# Altium PCB Industrial_IOT_Dev_Brd-v1.0.PcbDoc (part 8 of 8)
Units mil, origin at the board's own origin, x right, y up, seen from the top; angles counter-clockwise.
Board outline 6299.21 x 4724.41 mil, 4 copper layers (Top Layer, Layer 1, Layer 2, Bottom Layer), stack 62.047 mil thick; 376 components, 240 nets, 1129 pads, 635 vias.
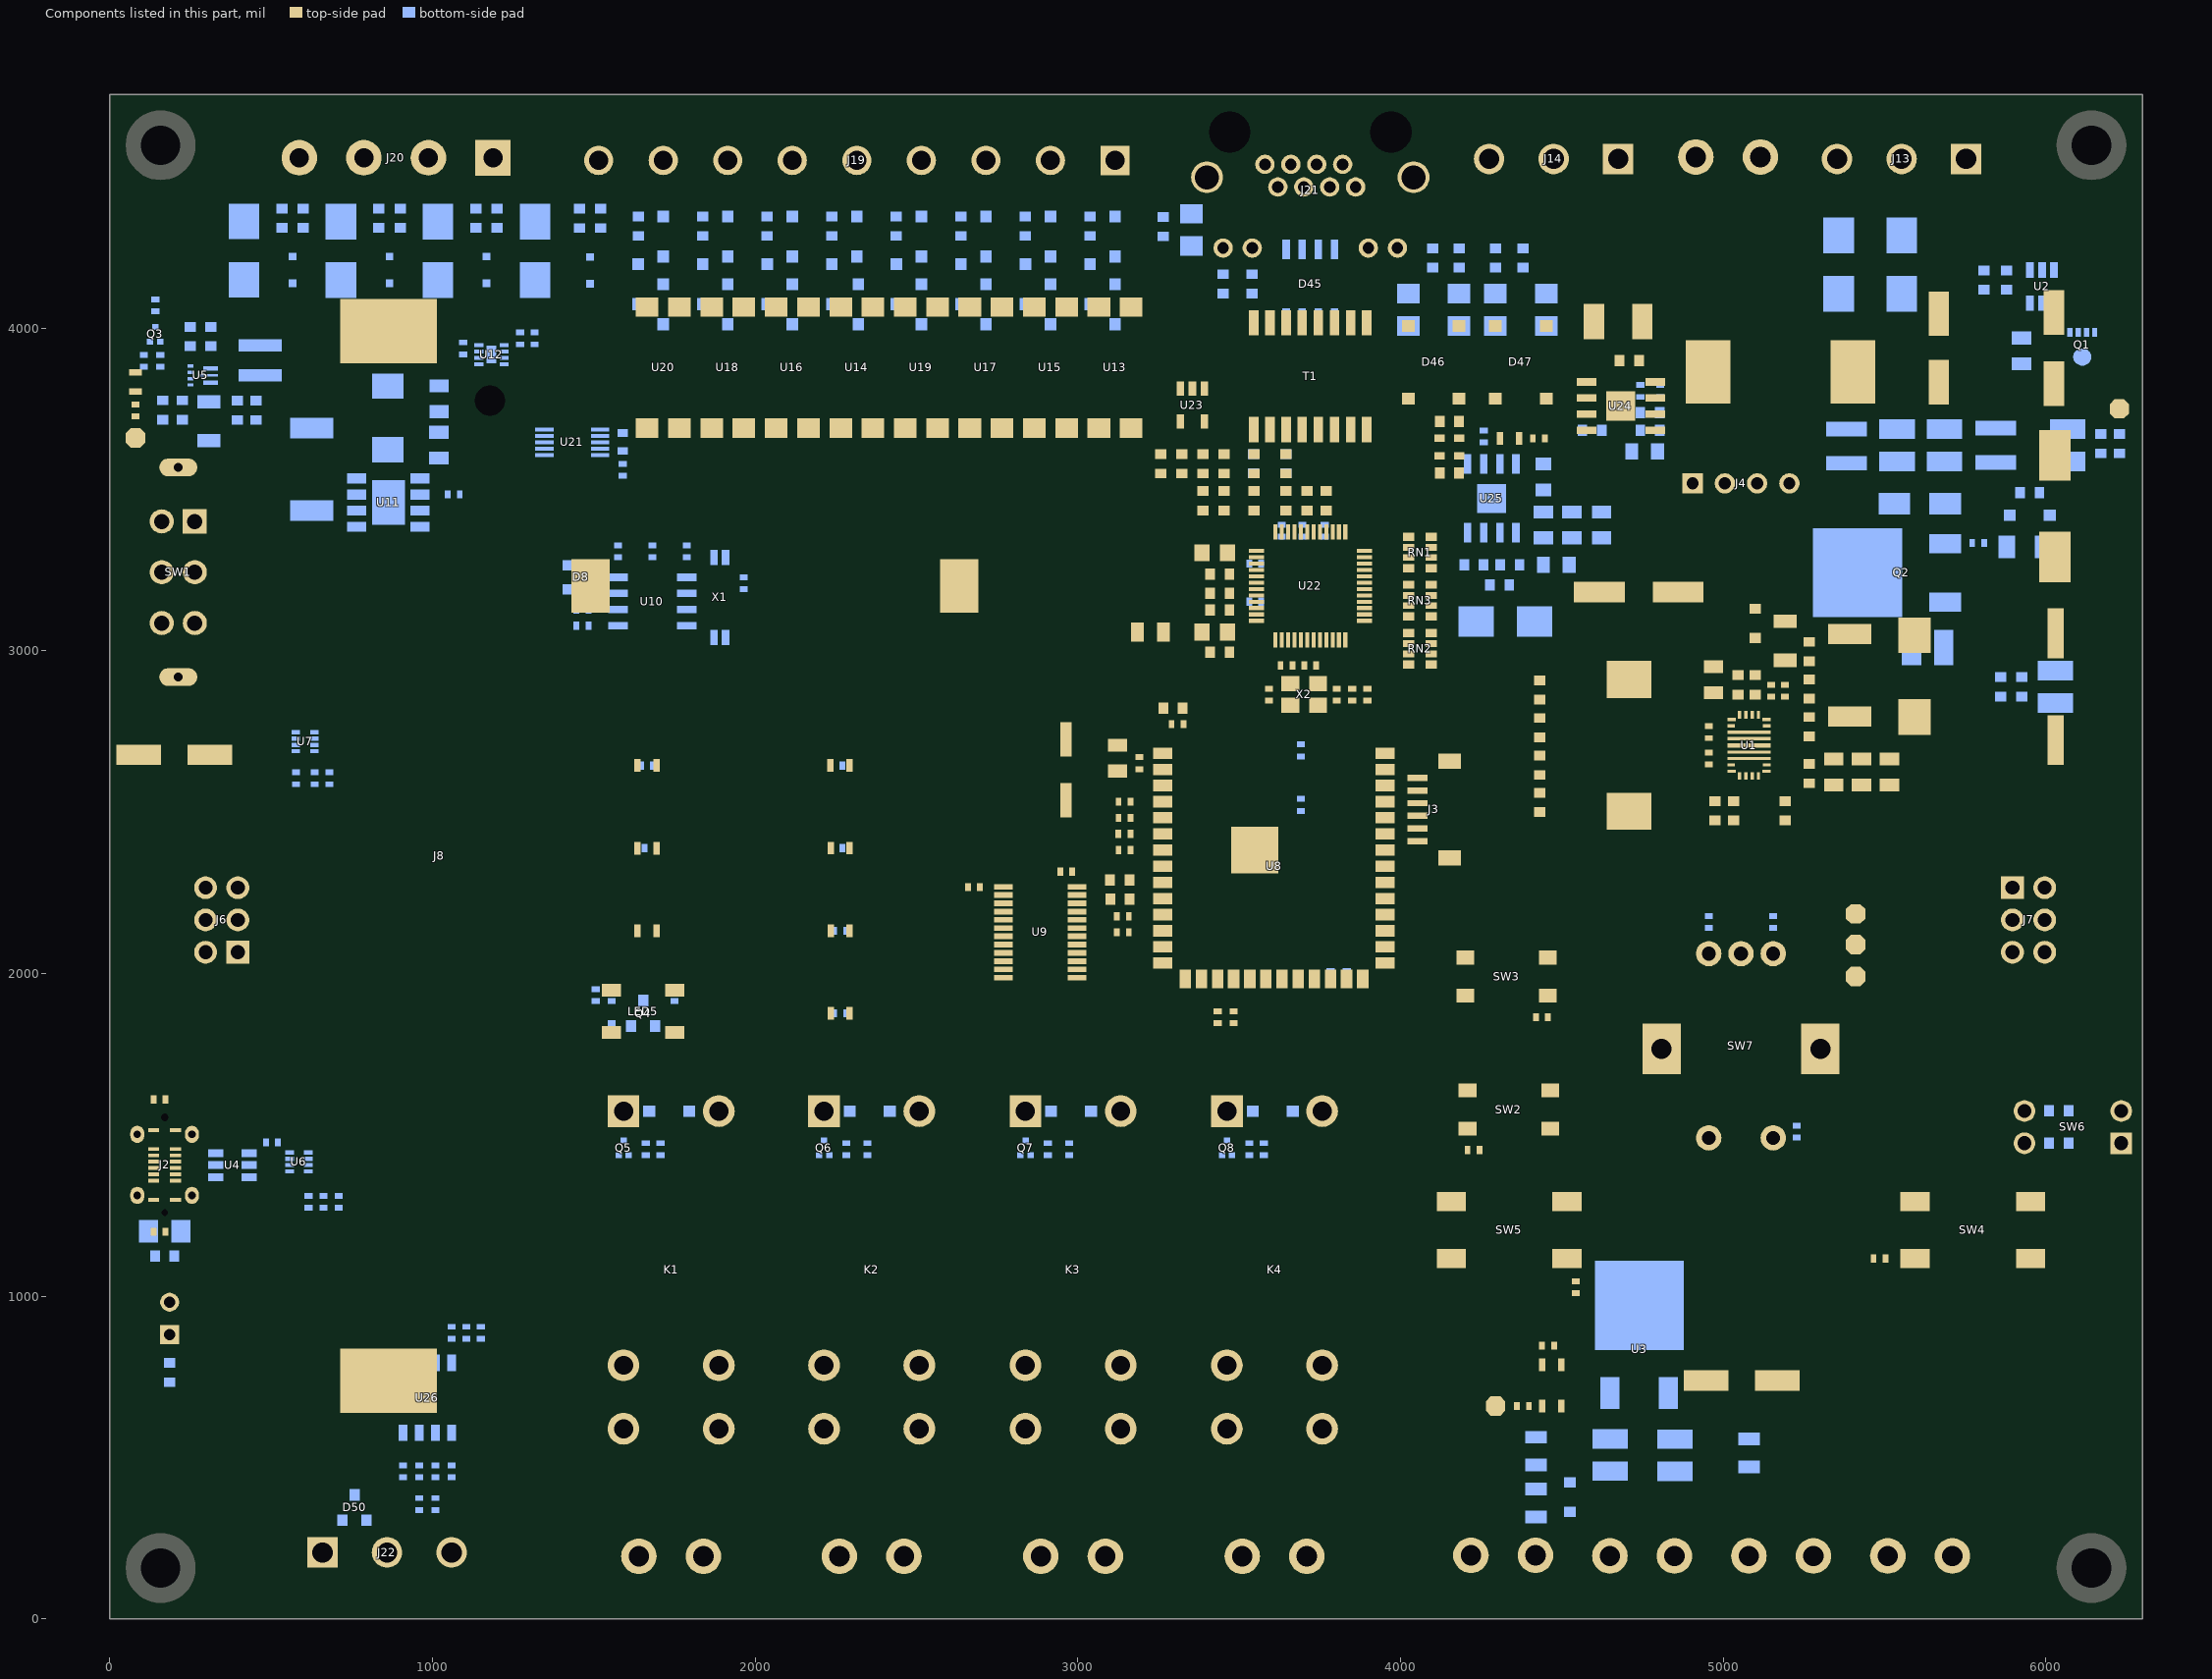
[diagram p7: the components of this part, seen from the top]

## Other copper
Top Layer:
  rectangle net VBUS-TYPEC: 119.1,1450.32 221.46,1466.77
  region net VBUS-TYPEC: 221.46,1363.71 119.1,1363.71 119.1,1332.76 221.46,1332.76
  rectangle net 3V3: 2968.2,2259.9 3056.17,2291.02
  rectangle net GND: 2748.98,2215.97 2790.27,2244.53
  region net #RD_N: 3460.63,3521.86 3444.48,3521.86 3444.48,3488.43 3460.63,3488.43
  rectangle net #RD_N: 3444.48,3522.25 3460.63,3555.67
  rectangle net #RD_P: 3379.23,3522.62 3395.38,3556.05
  region net #RD_P: 3395.38,3522.24 3379.23,3522.24 3379.23,3488.81 3395.38,3488.81
  region net RD_P: 3400.77,3744.09 3384.62,3744.09 3384.62,3705.52 3400.77,3705.52
  region net TD_N: 3325.4,3744.15 3309.25,3744.15 3309.25,3710.73 3325.4,3710.73
  rectangle net RD_N: 3384.6,3778.9 3400.75,3812.33
  rectangle net TD_P: 3309.61,3779.1 3325.76,3812.52
  rectangle net NetC1_2: 4942.54,2666.01 5005.13,2693.51
  rectangle net NetC15_2: 4916.86,2734.16 5005.13,2747.91
  rectangle net NetC1_2: 4916.86,2666.01 5005.13,2679.76
  rectangle net NetC15_2: 4942.54,2720.41 5005.13,2747.91
  rectangle net VIN: 5926,3527.27 6076.94,3733
  region net GND: 6075.98,0 6299.21,0 6299.21,223.23 ccw(c6141.37,157.85) 6141.37,328.7 ccw(c6141.36,157.85) 5970.51,157.85 ccw(c6141.36,157.85)
  region net GND: 6299.21,4501.18 6299.21,4724.41 6075.98,4724.41 ccw(c6141.36,4566.56) 5970.51,4566.56 ccw(c6141.36,4566.56) 6141.36,4395.71 ccw(c6141.36,4566.56)
  region net GND: 223.23,4724.41 0,4724.41 0,4501.18 ccw(c157.85,4566.56) 157.85,4395.71 ccw(c157.85,4566.56) 328.7,4566.56 ccw(c157.85,4566.56)
  region net GND: 0,223.23 0,0 223.23,0 ccw(c157.85,157.85) 328.7,157.85 ccw(c157.85,157.85) 157.85,328.7 ccw(c157.85,157.85)
  region net NetC67_2: 4545.92,3917.5 4545.92,3864.92 4536.25,3855.25 4535.92,3855.25 4535.92,3854.92 4535.92,3811.62 4544.09,3803.46 4598.73,3803.46 4606.94,3795.25 4606.94,3765.21 4598.73,3757 4501.44,3757 4491.73,3766.71 4491.73,3916.73 4500,3925 4538.42,3925
  region net 5V: 201 vertices and 20 holes, not listed, extent 241.34,610 5016.08,3037
  region net 3V3: 3292.82,2614.81 3163.12,2614.81 3135.08,2586.77 3135.08,2317.03 3135.06,2317.03 3135.06,2262.03 3135.08,2262.03 3135.08,2111.39 3127.52,2103.83 3082.21,2103.83 3075.39,2110.66 3075.39,2248.92 3064.41,2259.9 3037.26,2259.9 3037.26,2262.02 2968.2,2262.02 2968.2,2336.8 2955,2350 2908.05,2350 2890,2368.05 2890,2632.53 2907.72,2650.24 3292.82,2650.24
  region net 5V-PWR: 5135.25,3060.49 5135.25,3002.41 5145.95,2991.71 5227.49,2991.71 5227.49,2896.43 5217.02,2885.95 5179.16,2885.95 5172.18,2892.94 5172.18,2942.51 5165.19,2949.5 5039.51,2949.5 5029.09,2959.92 5029.09,3059.52 5039.86,3070.29 5125.45,3070.29
  region net NetC11_2: 5685,2840.08 5685,2647.04 5667.96,2630 5221.56,2630 5213.63,2637.93 5213.63,2704.42 5213.47,2704.58 5213.47,2711.3 5210.15,2719.31 5204.02,2725.45 5196,2728.77 5187.32,2728.77 5179.31,2725.45 5176.11,2722.25 5156.99,2722.25 5156.99,2742.98 5156.82,2742.98 5156.82,2743.14 5068.52,2743.14 5068.34,2743.57 5068.34,2752.82 5113.2,2752.82 5113.2,2752.67 5133.14,2752.67 5135.01,2752.3 5236.91,2752.3 5239.55,2752.82 5282.14,2752.82 5309.57,2780.25 5309.57,2835.96 5328.61,2855 5670.08,2855
  region net NetC1_2: 4878.22,2693.52 4883.27,2688.47 4891.29,2685.15 4899.96,2685.15 4907.98,2688.47 4911.18,2691.66 5002.96,2691.66 5002.96,2690.46 5005.13,2690.46 5005.13,2680.93 5002.96,2680.93 5002.96,2668.85 5000.14,2666.02 4989.99,2666.02 4978.02,2666.02 4977.54,2666.51 4932.54,2666.51 4932.54,2666.02 4838.49,2666.02 4819.99,2647.52 4819.99,2450.01 4799.99,2430.01 4413.91,2430.01 4400,2443.92 4400,2507.13 4413.17,2520.3 4600,2520.3 4609.99,2530.3 4609.99,2674.79 4628.72,2693.52
  region net NetC15_2: 4819.99,2963.91 4819.99,2766.4 4838.49,2747.9 4932.53,2747.9 4932.53,2747.4 4977.53,2747.4 4978.03,2747.9 4989.99,2747.9 5000.14,2747.9 5002.96,2745.07 5002.96,2732.98 5005.13,2732.98 5005.13,2723.45 5002.96,2723.45 5002.96,2722.25 4911.18,2722.25 4907.98,2725.45 4899.96,2728.77 4891.29,2728.77 4883.27,2725.45 4878.22,2720.4 4628.72,2720.4 4609.99,2739.13 4609.99,2883.63 4600,2893.62 4413.17,2893.62 4400,2906.79 4400,2970 4413.91,2983.91 4799.99,2983.91
  region net VBUS-TYPEC: 215.7,1494.48 219.44,1490.74 221.46,1485.85 221.46,1455.28 218.64,1452.45 177.21,1452.45 177.21,1450.32 163.35,1450.32 163.35,1452.45 119.1,1452.45 119.1,1483.75 119.1,1486.28 121.04,1490.97 124.63,1494.56 129.32,1496.51 208.16,1496.51 210.81,1496.51
  region net VBUS-TYPEC: 177.21,1361.58 221.46,1361.58 221.46,1330.29 221.46,1327.75 219.52,1323.06 215.93,1319.47 211.24,1317.53 132.4,1317.53 129.76,1317.53 124.87,1319.55 121.13,1323.29 119.1,1328.18 119.1,1357.73 122.35,1361.58 163.35,1361.58 163.35,1363.71 177.21,1363.71
  region net VDD: 3517.55,3083.95 3524.99,3076.51 3524.99,3005.04 3530.13,2999.9 3659.14,2999.9 3665.29,3006.05 3665.29,3057.97 3677.89,3057.97 3677.89,2941.78 3656.29,2941.78 3656.29,2971.93 3651.29,2976.93 3450.57,2976.93 3440.55,2986.95 3440.55,3083.95
  text "1" at 6172.62,523.44 h78.74 r90
Layer 1:
  region net NetC23_2: 282.08,1537.22 287.22,1532.08 290,1525.37 290,1521.74 290,1286.82 287.96,1281.89 284.18,1278.11 279.25,1276.07 218.49,1276.07 216.69,1277.87 208.68,1281.19 200,1281.19 191.98,1277.87 190.19,1276.07 182.21,1276.07 181.74,1276.53 174.31,1279.61 166.26,1279.61 158.82,1276.53 158.36,1276.07 150.38,1276.07 148.58,1277.87 140.57,1281.19 131.89,1281.19 123.87,1277.87 122.08,1276.07 58,1276.07 52.03,1278.54 47.47,1283.11 45,1289.07 45,1292.3 45,1521.02 45,1524.79 47.89,1531.77 53.23,1537.11 60.21,1540 120.04,1540 123.87,1536.16 131.89,1532.84 140.57,1532.84 148.58,1536.16 150.1,1537.68 154.08,1537.28 154.56,1536.57 161.77,1531.75 170.28,1530.05 178.79,1531.75 186.01,1536.57 186.49,1537.29 190.47,1537.68 191.98,1536.16 200,1532.84 208.68,1532.84 216.69,1536.16 220.53,1540 275.37,1540 hole: 208.68,1502.32 200,1502.32 191.98,1499 185.85,1492.86 182.53,1484.84 182.53,1476.17 185.85,1468.15 191.98,1462.02 200,1458.69 208.68,1458.69 216.69,1462.02 222.83,1468.15 226.15,1476.17 226.15,1484.84 222.83,1492.86 216.69,1499 hole: 140.57,1502.32 131.89,1502.32 123.87,1499 117.74,1492.86 114.42,1484.84 114.42,1476.17 117.74,1468.15 123.87,1462.02 131.89,1458.69 140.57,1458.69 148.58,1462.02 154.72,1468.15 158.04,1476.17 158.04,1484.84 154.72,1492.86 148.58,1499 hole: 89.97,1445.64 81.3,1445.64 73.28,1442.32 67.15,1436.18 63.82,1428.17 63.82,1419.49 67.15,1411.47 71.6,1407.02 67.15,1402.56 63.82,1394.54 63.82,1385.87 67.15,1377.85 73.28,1371.71 81.3,1368.39 89.97,1368.39 97.99,1371.71 104.13,1377.85 107.45,1385.87 107.45,1394.54 104.13,1402.56 99.67,1407.02 104.13,1411.47 107.45,1419.49 107.45,1428.17 104.13,1436.18 97.99,1442.32 hole: 208.68,1355.34 200,1355.34 191.98,1352.02 185.85,1345.88 182.53,1337.87 182.53,1329.19 185.85,1321.17 191.98,1315.04 200,1311.72 208.68,1311.72 216.69,1315.04 222.83,1321.17 226.15,1329.19 226.15,1337.87 222.83,1345.88 216.69,1352.02 hole: 140.57,1355.34 131.89,1355.34 123.87,1352.02 117.74,1345.88 114.42,1337.87 114.42,1329.19 117.74,1321.17 123.87,1315.04 131.89,1311.72 140.57,1311.72 148.58,1315.04 154.72,1321.17 158.04,1329.19 158.04,1337.87 154.72,1345.88 148.58,1352.02
  text "2" at 6172.62,642.82 h78.74 r90
Layer 2:
  region net VBUS-TYPEC: 230.31,1453.15 cw(c230.31,1463.4) 220.06,1463.4 220.06,1488.31 ccw(c211.79,1488.31) 211.79,1496.58 136.23,1496.58 134.54,1496.58 131.23,1495.92 128.12,1494.63 125.31,1492.76 122.92,1490.37 121.05,1487.57 119.76,1484.45 119.53,1483.28 119.1,1479.46 119.1,1329.52 119.61,1326.96 120.61,1324.54 122.06,1322.37 123.91,1320.52 126.09,1319.07 128.5,1318.07 131.06,1317.56 209.26,1317.56 211.88,1318.08 214.34,1319.1 216.56,1320.58 218.44,1322.46 219.92,1324.68 220.94,1327.14 221.46,1329.76 221.46,1355.69 221.55,1357.47 222.25,1360.96 223.61,1364.24 225.58,1367.2 228.1,1369.72 231.06,1371.7 234.35,1373.06 237.84,1373.75 239.62,1373.84 527.96,1373.84 529.56,1373.84 532.7,1374.46 535.66,1375.69 538.32,1377.47 540.59,1379.74 542.37,1382.4 543.59,1385.36 544.22,1388.5 544.22,1390.1 544.22,1404.78 544.22,1476.73 ccw(c522.95,1476.73) 522.95,1498 316.99,1498 ccw(c316.99,1481.27) 300.26,1481.27 300.26,1463.62 cw(c289.79,1463.62) 289.79,1453.15 hole: 360.04,1428.37 356.61,1428.37 353.22,1427.83 349.95,1426.77 346.89,1425.21 344.11,1423.19 341.69,1420.77 339.67,1417.99 338.11,1414.93 337.05,1411.67 336.51,1408.27 336.51,1404.84 337.05,1401.45 338.11,1398.19 339.67,1395.13 341.69,1392.35 344.11,1389.92 346.89,1387.9 349.95,1386.35 353.22,1385.28 356.61,1384.75 360.04,1384.75 363.43,1385.28 366.69,1386.35 369.75,1387.9 372.53,1389.92 374.96,1392.35 376.98,1395.13 378.54,1398.19 379.6,1401.45 380.13,1404.84 380.13,1408.27 379.6,1411.67 378.54,1414.93 376.98,1417.99 374.96,1420.77 372.53,1423.19 369.75,1425.21 366.69,1426.77 363.43,1427.83
  text "3" at 6172.62,830.3 h78.74 r90
Bottom Layer:
  rectangle net GND: 508.59,1463.48 591.62,1504.23
  rectangle net GND: 585.6,1439.29 628.47,1479.7
  rectangle net GND: 1128.6,3873.51 1183.02,3894.19
  rectangle net GND: 1083.21,3941.44 1180.66,3964.66
  rectangle net 5V-OR: 638.47,1419.61 782.57,1492.93
  rectangle net 5V-PWR: 638.47,1390.11 782.57,1412.05
  rectangle net 5V-OR: 680.94,2692.43 774.34,2714.6
  rectangle net 5V: 600.19,2721.75 611.69,2777
  rectangle net 5V: 658.06,2721.68 774.34,2795
  rectangle net 5V-BOOST: 422.35,2688.61 448.4,2714.6
  rectangle net 5V-BOOST: 422.35,2702.05 590.19,2714.6
  rectangle net 5V: 422.35,2721.68 553.81,2805
  rectangle net 5V-PWR: 638.47,1370.24 662.91,1412.05
  rectangle net 5V-PWR: 544.22,1330.97 592.36,1392.84
  rectangle net 5V-OR: 544.22,1419.61 710,1432.21
  rectangle net VBUS-TYPEC: 407.84,1391.76 535,1421.33
  rectangle net VBUS-TYPEC: 431.86,1399.92 570.6,1412.52
  rectangle net VBUS-TYPEC: 466.94,1381.58 535.19,1451.89
  rectangle net 5V-PWR: 466,1333.06 570.52,1371.05
  rectangle net 5V-OR: 686.41,2692.43 747.41,2706.23
  rectangle net 5V-OR: 656.17,2650.72 691.42,2714.6
  rectangle net 5V-OR: 621.69,2702.59 692.6,2714.6
  region net 5V: 711.43,2734.28 490.49,2734.28 490.49,2721.68 711.43,2721.68
  region net RS485_P: 725.79,305.5 747.25,326.96 738.38,335.82 716.92,314.37
  region net RS485_N: 800.63,314.37 779.18,335.82 770.31,326.96 791.77,305.5
  rectangle net NetR112_1: 4346.11,3548.15 4467.73,3609.18
  rectangle net NetC71_1: 4179.33,3043.76 4292,3221.5
  region net VBAT: 1157.83,3933.56 1043.79,3933.56 1043.79,3902.07 1157.83,3902.07
  rectangle net VBAT: 220.95,3877.71 260.17,3887.55
  rectangle net NetR49_2: 962.22,3471.91 1056.79,3496.91
  rectangle net NetR48_1: 600,3418.62 795.2,3450.2
  rectangle net NetL2_2: 278.82,3849.17 358.54,3857.04
  region net NetF6_2: 4418.28,163.91 4418.28,230.84 4198.59,230.84 4198.59,163.91
  region net NetF5_2: 5279.54,161.91 5279.54,228.84 5059.85,228.84 5059.85,161.91
  rectangle net NetF5_2: 5046.07,195.38 5113,490.54
  rectangle net VCC: 6066.07,3972.94 6133.79,4107.89
  pour cut-out: 3668.65,589.33 ccw(c3757.23,589.33) 3757.23,500.74 ccw(c3757.23,589.33) 3845.82,589.33 ccw(c3757.23,589.33) 3757.23,677.91 ccw(c3757.23,589.33)
  pour cut-out: 3373.35,589.33 ccw(c3461.93,589.33) 3461.93,500.74 ccw(c3461.93,589.33) 3550.52,589.33 ccw(c3461.93,589.33) 3461.93,677.91 ccw(c3461.93,589.33)
  pour cut-out: 3044.5,589.33 ccw(c3133.09,589.33) 3133.09,500.74 ccw(c3133.09,589.33) 3221.67,589.33 ccw(c3133.09,589.33) 3133.09,677.91 ccw(c3133.09,589.33)
  pour cut-out: 2749.2,589.33 ccw(c2837.79,589.33) 2837.79,500.74 ccw(c2837.79,589.33) 2926.37,589.33 ccw(c2837.79,589.33) 2837.79,677.91 ccw(c2837.79,589.33)
  pour cut-out: 2420.36,589.33 ccw(c2508.94,589.33) 2508.94,500.74 ccw(c2508.94,589.33) 2597.52,589.33 ccw(c2508.94,589.33) 2508.94,677.91 ccw(c2508.94,589.33)
  pour cut-out: 2125.06,589.33 ccw(c2213.64,589.33) 2213.64,500.74 ccw(c2213.64,589.33) 2302.22,589.33 ccw(c2213.64,589.33) 2213.64,677.91 ccw(c2213.64,589.33)
  pour cut-out: 1503.7,589.33 ccw(c1592.28,589.33) 1592.28,500.74 ccw(c1592.28,589.33) 1680.86,589.33 ccw(c1592.28,589.33) 1592.28,677.91 ccw(c1592.28,589.33)
  pour cut-out: 1799,589.33 ccw(c1887.58,589.33) 1887.58,500.74 ccw(c1887.58,589.33) 1976.16,589.33 ccw(c1887.58,589.33) 1887.58,677.91 ccw(c1887.58,589.33)
  region net GND: 6075.98,0 6299.21,0 6299.21,223.23 ccw(c6141.36,157.85) 6141.36,328.7 ccw(c6141.36,157.85) 5970.51,157.85 ccw(c6141.36,157.85)
  region net GND: 6299.21,4501.18 6299.21,4724.41 6075.98,4724.41 ccw(c6141.36,4566.56) 5970.51,4566.56 ccw(c6141.36,4566.56) 6141.36,4395.71 ccw(c6141.36,4566.56)
  region net GND: 223.23,4724.41 0,4724.41 0,4501.18 ccw(c157.85,4566.56) 157.85,4395.71 ccw(c157.85,4566.56) 328.7,4566.56 ccw(c157.85,4566.56)
  region net GND: 0,223.23 0,0 223.23,0 ccw(c157.85,157.85) 328.7,157.85 ccw(c157.85,157.85) 157.85,328.7 ccw(c157.85,157.85)
  pour cut-out: 3199.44,2382.53 3199.44,2532.95 3212.6,2532.95 3212.6,2382.53
  region net VIN: 6045.67,3953.08 6055.74,3943.02 6268.98,3943.02 6268.98,3656.91 6012.73,3656.91 5787.29,3656.91 5773.86,3670.34 5773.86,3778.86 5790,3795 5992.73,3795 6012.92,3815 6012.92,4100.97 6045.67,4100.97
  region net VCC: 5944.09,4672.12 5944.22,4671.72 5939.46,4662.81 5931.09,4642.61 5924.75,4621.69 5920.48,4600.24 5918.34,4578.48 5918.34,4552.96 5922.15,4524.04 5929.7,4495.87 5940.86,4468.92 5955.44,4443.65 5973.2,4420.51 5993.83,4399.88 6016.97,4382.12 6042.24,4367.54 6069.19,4356.37 6097.36,4348.82 6126.29,4345.02 6140.87,4345.02 6152.3,4345.02 6175.03,4347.36 6197.4,4352.01 6219.18,4358.94 6240.14,4368.06 6260.05,4379.27 6265.43,4383.08 6268.98,4381.24 6268.98,3972.94 6202.54,3972.94 6202.54,4010.5 6132.84,4010.5 6132.84,3972.94 6066.07,3972.94 6066.07,4281.93 6051,4297 5773,4297 5759,4283 5759,4150.3 5775.77,4133.53 5962.36,4133.53 5962.44,4133.47 5962.53,4133.03 5962.53,3949.13 5667.56,3949.13 5667.1,3949.22 5666.71,3949.48 5651.25,3964.95 5650.99,3965.33 5650.9,3965.79 5650.9,4212.23 5630.97,4232.15 5503.35,4232.15 5502.89,4232.24 5502.5,4232.5 5480.19,4254.81 5479.93,4255.2 5479.84,4255.66 5479.84,4429.46 5460.3,4449 5062.81,4449 5035,4476.81 5035,4643.5 5035.09,4643.96 5035.35,4644.35 5065.65,4674.65 5066.04,4674.91 5066.5,4675 5941.44,4675
  region net 24V: 34 vertices and 6 holes, not listed, extent 5004.17,2421 6160,3373
  region net NetC23_2: 114.42,1335.1 114.42,1329.19 117.74,1321.17 123.87,1315.04 131.89,1311.72 140.57,1311.72 148.58,1315.04 154.72,1321.17 156.23,1324.82 160.23,1324.02 160.23,1291.53 160.23,1289.47 158.65,1285.67 155.74,1282.76 151.94,1281.19 149.89,1281.19 131.89,1281.19 128.48,1280.85 122.18,1278.24 117.36,1273.42 114.75,1267.13 114.42,1263.72 114.42,1255.04 114.75,1251.63 117.36,1245.33 122.18,1240.51 128.48,1237.9 131.89,1237.57 149.73,1237.57 153.39,1236.92 155.68,1235.97 158.63,1233.02 160.23,1229.16 160.23,1227.07 160.23,1201.03 160.23,1115.8 160.23,1113.15 158.2,1108.27 154.46,1104.52 149.57,1102.5 81.33,1102.5 73.37,1105.8 67.28,1111.89 63.98,1119.85 63.98,1124.15 63.98,1313.68 63.98,1317.45 63.98,1321.76 67.28,1329.71 73.37,1335.81 81.33,1339.1 85.64,1339.1 110.93,1339.1
  region net 5V-OR: 782.57,1524.62 782.57,1432.44 638.47,1432.44 638.47,1461.89 638.47,1483.29 637.42,1485.81 628.02,1495.22 620,1498.54 615.28,1498.54 615.28,1527.37 627.54,1539.63 767.57,1539.63
  region net 5V-PWR: 782.57,1196.26 766.91,1180.6 485,1180.6 466,1199.6 466,1360.42 466.94,1361.19 535.19,1361.19 542.99,1362.74 549.61,1367.16 554.03,1373.78 555.17,1379.53 570.6,1379.53 578.4,1381.09 585.02,1385.51 588.09,1390.11 592.09,1388.9 592.09,1370.24 597.44,1370.24 597.44,1329.99 593.69,1329.99 593.69,1291.99 638.69,1291.99 640.41,1288.71 640.41,1254.99 641.51,1254.99 642.1,1254.46 643.85,1250.99 641.1,1244.34 641.1,1235.66 644.42,1227.65 650.55,1221.51 658.57,1218.19 667.25,1218.19 675.26,1221.51 681.4,1227.65 684.49,1235.12 686.96,1235.43 688.56,1235.27 691.51,1228.14 697.65,1222.01 705.66,1218.69 714.34,1218.69 722.35,1222.01 728.49,1228.14 731.81,1236.16 731.81,1244.84 729.05,1251.5 730.8,1254.95 731.39,1255.5 732.5,1255.5 732.5,1293.5 689.41,1293.5 687.5,1293.5 685.41,1296.63 685.41,1329.99 640.41,1329.99 638.69,1329.99 633.12,1329.99 633.12,1370.24 638.47,1370.24 638.47,1399.22 782.57,1399.22
  region net 5V-OR: 774.34,2650.28 766.51,2642.45 664.44,2642.45 656.17,2650.72 656.17,2672.31 658.06,2672.31 658.06,2701.29 774.34,2701.29
  region net 5V: 774.34,2838.45 774.34,2734.99 658.06,2734.99 658.06,2763.97 655.27,2763.97 655.27,2773.58 656.69,2777 656.69,2785.68 653.36,2793.7 647.23,2799.83 639.21,2803.15 630.54,2803.15 622.52,2799.83 616.38,2793.7 613.06,2785.68 613.06,2777 614.48,2773.58 614.48,2763.97 611.69,2763.97 611.69,2734.28 600.19,2734.28 600.19,2763.97 553.81,2763.97 553.81,2734.99 422.35,2734.99 422.35,2832.75 437.6,2848 764.79,2848
  region net VBAT: 1069,4022 1069,3940.94 1073.21,3936.73 1073.21,3936.66 1073.28,3936.66 1078.5,3931.44 1120.27,3931.44 1157.28,3931.44 1157.28,3904.19 1120.27,3904.19 1117.99,3904.19 1108.21,3894.41 1108.21,3790.03 1099.18,3781 710.38,3781 692.5,3763.12 692.5,3645.5 679,3632 574,3632 558.64,3647.36 558.64,3900 536.8,3921.84 271.9,3921.84 266.43,3916.36 266.43,3884.12 260.17,3877.87 231.42,3877.87 231.42,3877.71 220.95,3877.71 214.84,3883.82 214.84,3957.4 229.28,3971.84 347.78,3971.84 358.54,3982.6 358.54,4027.52 367.02,4036 1055,4036
  region net 5V-BOOST: 433.34,3664.76 431.92,3661.34 431.92,3652.66 435.24,3644.65 441.38,3638.51 449.4,3635.19 458.07,3635.19 466.09,3638.51 467.54,3639.96 471.23,3638.43 471.23,3525.58 456.4,3510.74 274.26,3510.74 259.3,3525.7 259.3,3533.93 263.16,3535.52 271.01,3541.54 277.03,3549.39 280.81,3558.53 282.1,3568.33 280.81,3578.14 277.03,3587.27 271.01,3595.12 263.16,3601.14 259.3,3602.74 259.3,3660.38 271.12,3672.19 375.46,3672.19 375.46,3664.41 374.19,3661.34 374.19,3652.66 377.51,3644.65 383.65,3638.51 391.66,3635.19 400.34,3635.19 408.35,3638.51 414.49,3644.65 417.81,3652.66 417.81,3661.34 416.25,3665.12 416.25,3672.19 433.34,3672.19
  pour cut-out: 3212.55,1928.92 3162.3,1928.92 3162.3,1939.26 3212.55,1939.26
  region net 5V-BOOST: 476.07,2707.26 482.68,2702.84 490.49,2701.29 539.97,2701.29 541.5,2697.6 541,2697.1 541,2567 528.94,2554.94 432.73,2554.94 422.35,2565.32 422.35,2696.96 432.66,2707.26
  region net 5V-BOOST: 545.9,2702 541,2697.1 488.43,2697.1 482.68,2702.84 488.14,2708.3 539.6,2708.3
  region net NetD7_1: 5751.34,3502.22 5762.5,3491.05 5762.5,3391.52 5780.5,3373.52 5780.5,3295.28 5771.5,3286.28 5638.81,3286.28 5638.81,3286.48 5630,3295.28 5630,3489 5643.22,3502.22
  region net 24V-ADAP: 5935,3601.91 5935,3302.92 5918.36,3286.28 5808.5,3286.28 5799.5,3295.28 5799.5,3347.59 5799.5,3380 5781.86,3397.64 5781.86,3606.8 5791.98,3616.91 5920,3616.91
  region net 5V-OR: 1084.79,3608 1084.79,3528.35 1075.06,3518.62 932.6,3518.62 932.6,3606.79 942.8,3617 1075.79,3617
  region net NetL2_2: 532.93,3872.64 532.93,3834.06 525.47,3826.6 366.35,3826.6 344.29,3848.66 278.82,3848.66 278.82,3859.85 344.84,3859.85 366.9,3881.91 523.66,3881.91
  region net NetC25_2: 271.12,3830.64 278.82,3838.34 335.91,3838.34 365.41,3808.84 526.36,3808.84 532.94,3802.26 532.94,3760.43 525.54,3753.03 364.08,3753.03 353,3741.94 312.05,3701 208.4,3701 201.52,3707.88 201.52,3741.52 208.26,3748.26 266.35,3748.26 271.12,3753.03
  text "4" at 6173.62,964.8 h78.74 r90
Multi-Layer:
  pour cut-out: 0,0 314.22,0 314.71,-0.49 ccw(c157.36,156.86) 379.89,156.86 ccw(c157.36,156.86) 157.36,379.39 ccw(c157.36,156.86) -5.47,308.54 -0.49,303.56
  pour cut-out: -0.99,4724.41 -0.99,4410.2 -1.48,4409.7 ccw(c155.87,4567.06) 155.87,4344.52 ccw(c155.87,4567.06) 378.41,4567.06 ccw(c155.87,4567.06) 307.56,4729.89 302.57,4724.9
  pour cut-out: 6298.23,4724.41 5984.01,4724.41 5983.52,4724.9 ccw(c6140.87,4567.55) 5918.34,4567.55 ccw(c6140.87,4567.55) 6140.87,4345.02 ccw(c6140.87,4567.55) 6303.7,4415.87 6298.72,4420.85
  pour cut-out: 6298.23,0.49 6298.23,314.71 6298.72,315.2 ccw(c6141.37,157.85) 6141.37,380.38 ccw(c6141.37,157.85) 5918.83,157.85 ccw(c6141.37,157.85) 5989.68,-4.98 5994.67,0
  pour cut-out: 6200.78,466.78 6068.78,466.78 6068.78,1005.78 6200.78,1005.78
  pour cut-out: 6200.78,466.78 6068.78,466.78 6068.78,1005.78 6200.78,1005.78

## Silkscreen, mask and mechanical layers (free items; w line width, h text height)
Top Overlay:
  circle w5: c1657.46,2644.46 r98.43
  circle w5: c1657.67,2132.68 r98.43
  circle w5: c1657.69,2388.57 r98.43
  circle w5: c2271.2,1876.91 r98.43
  circle w5: c2271.2,2132.8 r98.43
  circle w5: c2271.2,2388.69 r98.43
  circle w5: c2270.98,2644.59 r98.43
  lines w5: 3128.57,2096.61 3128.57,2063.98 3131.68,2063.98 3129.22,2063.98 ; 3160,3436.76 3220,3436.76 ; 3515.4,3650 3220,3650 3220,3400 3585.38,3400 3679.35,3400 3680,3400 3680,3627.46 ; 3786.15,2813.28 3930,2813.28 3930,2915.28 3792.83,2915.28 3786.15,2915.28 ; 3930,2887.41 3960,2887.41 ; 5245.72,2832.41 5015.57,2832.41 5015.57,2846.72 5015.57,2960 5141.95,2960 5141.95,2930.41 5245.72,2930.41 ; 2730,3502.21 3157.33,3502.21 3157.33,3620 2730,3620 2730,3502.21 ; 2830,3230 3160,3230 3160,3480 2830,3480 2830,3230 ; 3064.04,2096.61 3193.09,2096.61 3193.09,2324.45 3064.04,2324.45 3064.04,2096.61 ; 3064.45,1848.29 3193.98,1848.29 3193.98,2063.98 3064.45,2063.98 3064.45,1848.29 ; 3960,2807.78 4118.68,2807.78 4118.68,2918.09 3960,2918.09 3960,2807.78 ; 4860,2250.37 4919.58,2250.37 4919.58,2440 4860,2440 4860,2250.37 ; 4930,2621.35 4990,2621.35 4990,2794.15 4930,2794.15 4930,2621.35 ; 5290,3210 5537.19,3210 5537.19,3360 5290,3360 5290,3210
  lines w7: 1622.31,3630 1622.31,3602.47 2718.11,3602.47
  text "A4" at 647.03,4318.69 h78.74 r180
  text "A3" at 846.45,4319.01 h78.74 r180
  text "A2" at 1046.37,4318.69 h78.74 r180
  text "A1" at 1244.37,4318.69 h78.74 r180
  text "24V" at 5195.45,4313.58 h78.74 r180
  text "24V" at 5424.08,4313.58 h78.74 r180
  text "24V" at 5624.08,4313.58 h78.74 r180
  text "24V" at 5824.08,4313.58 h78.74 r180
  text "GND" at 4360.33,4301.58 h78.74 r180
  text "GND" at 4560.33,4301.58 h78.74 r180
  text "GND" at 4760.33,4301.58 h78.74 r180
  text "GND" at 4990.96,4301.58 h78.74 r180
  text "D8" at 1772.01,4293.18 h78.74 r180
  text "D7" at 1972.01,4292.52 h78.74 r180
  text "D6" at 2172.15,4293.18 h78.74 r180
  text "D5" at 2372.04,4292.52 h78.74 r180
  text "D4" at 2572.59,4292.52 h78.74 r180
  text "D3" at 2772.01,4293.18 h78.74 r180
  text "D2" at 2972.01,4292.52 h78.74 r180
  text "D1" at 3172.01,4292.52 h78.74 r180
  text "GND" at 1581.07,4274.52 h78.74 r180
  text "DC POWER IN" at 5823.95,4235.39 h100 r180
  text "ANALOG INPUT" at 1244.37,4233.91 h100 r180
  text "DIGITAL INPUT" at 3172.01,4208.07 h100 r180
  text "ETHERNET" at 4045.96,4176.35 h100 r180
  text "5VB" at 99.17,3925.3 h78.74 r90
  text "24V-ADP" at 6248.03,3818.19 h78.74 r90
  text "PWR SW" at 267.64,3616.19 h100 r90
  text "OLED" at 4839.1,3375.6 h100
  text "1" at 5274.53,3215 h70 r90
  text "1" at 5135.15,2986.78 h70 r90
  text "POWER" at 1808.77,2611.82 h78.74
  text "RELAY 1" at 2385.28,2612.27 h78.74
  text "2" at 4944.21,2569.57 h70
  text "I2C / OUT" at 6030.26,2479.73 h78.74
  text "BAT-FULL" at 1820.77,2368.92 h78.74
  text "RELAY 2" at 2385.28,2356.37 h78.74
  text "VOLTLINK" at 4273.3,2335.24 h78.74 r90
  text "2" at 4809.67,2253 h70
  text "5V-PWR" at 5478.44,2164.55 h78.74
  text "CHRG" at 1808.77,2100.05 h78.74
  text "RELAY 3" at 2385.28,2100.15 h78.74
  text "BOOT" at 4173.28,2094.64 h78.74
  text "CC#" at 5478.44,2069.19 h78.74
  text "PG" at 5478.44,1970.19 h78.74
  text "RELAY 4" at 2397.28,1856.59 h78.74
  text "RGB" at 1808.77,1844.14 h78.74
  text "I2C / IN" at 9.26,1738.09 h78.74
  text "RESET" at 4180.33,1685.9 h78.74
  text "I2C ADDRESS" at 5868.94,1679.27 h78.74
  text "ENCODER" at 4818.88,1360.67 h100
  text "TYPE-C" at 366.72,1242.32 h100 r90
  text "BATTERY" at 1418.89,1016.81 h100 r90
  text "BACK" at 4179.15,989.96 h100
  text "SELECT" at 5616.17,989.95 h100
  text "RS-485" at 366.72,755.76 h100 r90
  text "5V0" at 4547.57,755.37 h78.74
  text "3V3" at 4548.13,627.8 h78.74
  text "RS-485" at 602.76,506.01 h100
  text "DC POWER OUT" at 4149.34,489.11 h100
  text "3V3" at 4161.42,424.91 h78.74
  text "3V3" at 4361.42,424.91 h78.74
  text "GND" at 4583.15,422.91 h78.74
  text "GND" at 4783.15,422.91 h78.74
  text "5V0" at 5022.6,422.91 h78.74
  text "5V0" at 5222.6,422.91 h78.74
  text "GND" at 5444.41,422.91 h78.74
  text "GND" at 5644.41,422.91 h78.74
  text "A" at 602.76,418.16 h78.74
  text "B" at 800.75,418.16 h78.74
  text "GND" at 974.11,417.83 h78.74
  text "NO1" at 1768.15,412.24 h100
  text "NO2" at 2384.83,412.24 h100
  text "NO3" at 3008.89,412.24 h100
  text "NO4" at 3632.3,412.24 h100
  text "COM" at 1539.15,410.99 h100
  text "COM" at 2160.5,410.99 h100
  text "COM" at 2784.65,410.99 h100
  text "COM" at 3408.8,410.99 h100
Bottom Overlay:
  drawing of 36 lines, arcs and shapes, not listed
  text "CAUTION" at 2947.58,1092.45 h120
  text "HIGH VOLTAGE" at 3049.91,990.72 h120
  text "Rev-v1.0" at 5785.72,522.08 h60 r270
  text "IOT-DEV-BOARD" at 5892.19,365.55 h60 r270
Top Solder:
  rectangle: 6062.22,461.92 6208.23,1011.28
  region: 6299.21,223.23 6299.21,0 6075.98,0 cw(c6141.37,157.85) 5970.51,157.85 cw(c6141.36,157.85) 6141.36,328.7 cw(c6141.37,157.85)
  region: 6075.98,4724.41 6299.21,4724.41 6299.21,4501.18 cw(c6141.36,4566.56) 6141.36,4395.71 cw(c6141.36,4566.56) 5970.51,4566.56 cw(c6141.36,4566.56)
  region: 0,4501.18 0,4724.41 223.23,4724.41 cw(c157.85,4566.56) 328.7,4566.56 cw(c157.85,4566.56) 157.85,4395.71 cw(c157.85,4566.56)
  region: 223.23,0 0,0 0,223.23 cw(c157.85,157.85) 157.85,328.7 cw(c157.85,157.85) 328.7,157.85 cw(c157.85,157.85)
Bottom Solder:
  rectangle: 6062.22,461.92 6208.23,1011.28
  region: 6075.98,0 6299.21,0 6299.21,223.23 ccw(c6141.36,157.85) 6141.36,328.7 ccw(c6141.36,157.85) 5970.51,157.85 ccw(c6141.36,157.85)
  region: 6299.21,4501.18 6299.21,4724.41 6075.98,4724.41 ccw(c6141.36,4566.56) 5970.51,4566.56 ccw(c6141.36,4566.56) 6141.36,4395.71 ccw(c6141.36,4566.56)
  region: 223.23,4724.41 0,4724.41 0,4501.18 ccw(c157.85,4566.56) 157.85,4395.71 ccw(c157.85,4566.56) 328.7,4566.56 ccw(c157.85,4566.56)
  region: 0,223.23 0,0 223.23,0 ccw(c157.85,157.85) 328.7,157.85 ccw(c157.85,157.85) 157.85,328.7 ccw(c157.85,157.85)
Board Outline:
  lines w7: 1354.99,844.5 ccw(c1374,844.5) 1374,825.48 1375,825.48 ccw(c1375,845.5) 1395.01,845.5 cw(c1482.76,845.5) 1482.76,933.25 1511.21,933.25 ccw(c1511.21,952.93) 1530.9,952.93 ccw(c1510.55,952.93) 1510.55,973.28 1482.76,973.28 ccw(c1482.76,845.5) 1354.98,845.5 ; 3994.53,844.5 cw(c3975.51,844.5) 3975.51,825.48 3974.52,825.48 cw(c3974.52,845.5) 3954.5,845.5 ccw(c3866.75,845.5) 3866.75,933.25 3838.3,933.25 cw(c3838.3,952.93) 3818.62,952.93 cw(c3838.96,952.93) 3838.96,973.28 3866.75,973.28 cw(c3866.75,845.5) 3994.53,845.5 ; 1354.99,124.01 ccw(c1375,124.01) 1375,103.99 ccw(c1375,124.01) 1395.01,124.01 1395.01,711.52 ccw(c1375,711.52) 1375,731.53 ccw(c1375,711.52) 1354.99,711.52 1354.99,124.01 ; 3954.5,124.01 ccw(c3974.52,124.01) 3974.52,103.99 ccw(c3974.52,124.01) 3994.53,124.01 3994.53,711.52 ccw(c3974.52,711.52) 3974.52,731.53 ccw(c3974.52,711.52) 3954.5,711.52 3954.5,124.01
  lines w10: 0,0 6299.21,0 6299.21,4724.41 0,4724.41 0,0 ; 1632.27,953.51 cw(c1652.28,953.51) 1652.28,973.53 1947.58,973.53 cw(c1947.58,953.51) 1967.6,953.51 cw(c1947.58,953.51) 1947.58,933.5 1652.28,933.5 cw(c1652.28,953.51) 1632.27,953.51 ; 2133.62,953.51 cw(c2153.64,953.51) 2153.64,973.53 2568.94,973.53 cw(c2568.94,953.51) 2588.95,953.51 cw(c2568.94,953.51) 2568.94,933.5 2153.64,933.5 cw(c2153.64,953.51) 2133.62,953.51 ; 2757.77,953.51 ccw(c2777.79,953.51) 2777.79,933.5 3193.09,933.5 ccw(c3193.09,953.51) 3213.1,953.51 ccw(c3193.09,953.51) 3193.09,973.53 2777.79,973.53 ccw(c2777.79,953.51) 2757.77,953.51 ; 3381.92,953.51 cw(c3401.93,953.51) 3401.93,973.53 3697.23,973.53 cw(c3697.23,953.51) 3717.25,953.51 cw(c3697.23,953.51) 3697.23,933.5 3401.93,933.5 cw(c3401.93,953.51) 3381.92,953.51
Fabrication:
  drawing of 295 lines, arcs and shapes, not listed
  text "Layer" at 7740.48,5180 h60
  text "Name" at 8150.39,5180 h60
  text "Material" at 9080.14,5180 h60
  text "Thickness" at 9640,5180 h60
  text "Constant" at 10289.84,5180 h60
  text "Board Layer Stack" at 10859.7,5180 h60
  text "Top Overlay" at 8150.39,5060 h60
  text "Top Solder" at 8150.39,4940 h60
  text "SM-001" at 9080.14,4940 h60
  text "0.025mm" at 9640,4940 h60
  text "4" at 10289.84,4940 h60
  text "1" at 7740.48,4820 h60
  text "Top Layer" at 8150.39,4820 h60
  text "0.035mm" at 9640,4820 h60
  text "Dielectric 2" at 8150.39,4700 h60
  text "PP-006" at 9080.14,4700 h60
  text "0.203mm" at 9640,4700 h60
  text "4.4" at 10289.84,4700 h60
  text "2" at 7740.48,4580 h60
  text "Layer 1" at 8150.39,4580 h60
  text "CF-004" at 9080.14,4580 h60
  text "0.035mm" at 9640,4580 h60
  text "Dielectric 1" at 8150.39,4460 h60
  text "FR-4" at 9080.14,4460 h60
  text "1.030mm" at 9640,4460 h60
  text "4.6" at 10289.84,4460 h60
  text "3" at 7740.48,4340 h60
  text "Layer 2" at 8150.39,4340 h60
  text "CF-004" at 9080.14,4340 h60
  text "0.035mm" at 9640,4340 h60
  text "Dielectric 3" at 8150.39,4220 h60
  text "PP-006" at 9080.14,4220 h60
  text "0.203mm" at 9640,4220 h60
  text "4.4" at 10289.84,4220 h60
  text "4" at 7740.48,4100 h60
  text "Bottom Layer" at 8150.39,4100 h60
  text "0.035mm" at 9640,4100 h60
  text "Bottom Solder" at 8150.39,3980 h60
  text "SM-001" at 9080.14,3980 h60
  text "0.025mm" at 9640,3980 h60
  text "4" at 10289.84,3980 h60
  text "Bottom Overlay" at 8150.39,3860 h60
  text "Total board thickness:" at 7740.48,3740 h60
  text "1.627mm" at 9640,3740 h60
Drill Drawing:
  drawing of 189 lines, arcs and shapes, not listed
  text "Symbol" at 125.39,8870 h72
  text "Count" at 631.27,8870 h72
  text "Hole Size" at 1231.11,8870 h72
  text "Plated" at 2380.77,8870 h72
  text "Hole Type" at 2886.65,8870 h72
  text "Drill Layer Pair" at 3620.45,8870 h72
  text "Via/Pad" at 5120,8870 h72
  text "Pad Shape" at 5709.85,8870 h72
  text "Template" at 6455.65,8870 h72
  text "Description" at 8714.95,8870 h72
  text "Hole Tolerance (+)" at 9568.71,8870 h72
  text "Hole Tolerance (-)" at 10902.32,8870 h72
  text "1" at 631.27,8720 h60
  text "20.47mil (0.520mm)" at 1231.11,8720 h60
  text "NPTH" at 2380.77,8720 h60
  text "Round" at 2886.65,8720 h60
  text "Top Layer - Bottom Layer" at 3620.45,8720 h60
  text "Pad" at 5120,8720 h60
  text "Rounded" at 5709.85,8720 h60
  text "c0hn52" at 6455.65,8720 h60
  text "1" at 631.27,8570 h60
  text "23.62mil (0.600mm)" at 1231.11,8570 h60
  text "NPTH" at 2380.77,8570 h60
  text "Slot" at 2886.65,8570 h60
  text "Top Layer - Bottom Layer" at 3620.45,8570 h60
  text "Pad" at 5120,8570 h60
  text "Rounded" at 5709.85,8570 h60
  text "c0hn60_72" at 6455.65,8570 h60
  text "1" at 631.27,8420 h60
  text "94.49mil (2.400mm)" at 1231.11,8420 h60
  text "NPTH" at 2380.77,8420 h60
  text "Round" at 2886.65,8420 h60
  text "Top Layer - Bottom Layer" at 3620.45,8420 h60
  text "Pad" at 5120,8420 h60
  text "Rounded" at 5709.85,8420 h60
  text "c0hn240p0" at 6455.65,8420 h60
  text "2" at 631.27,8270 h60
  text "27.56mil (0.700mm)" at 1231.11,8270 h60
  text "PTH" at 2380.77,8270 h60
  text "Slot" at 2886.65,8270 h60
  text "Top Layer - Bottom Layer" at 3620.45,8270 h60
  text "Pad" at 5120,8270 h60
  text "Rounded" at 5709.85,8270 h60
  text "r140_300h70_230r70m150_310mx150_310p0" at 6455.65,8270 h60
  text "2" at 631.27,8120 h60
  text "35.43mil (0.900mm)" at 1231.11,8120 h60
  text "PTH" at 2380.77,8120 h60
  text "Round" at 2886.65,8120 h60
  text "Top Layer - Bottom Layer" at 3620.45,8120 h60
  text "Pad" at 5120,8120 h60
  text "(Mixed)" at 5709.85,8120 h60
  text "(Mixed)" at 6455.65,8120 h60
  text "2" at 631.27,7970 h60
  text "62.99mil (1.600mm)" at 1231.11,7970 h60
  text "PTH" at 2380.77,7970 h60
  text "Rectangle" at 2886.65,7970 h60
  text "Top Layer - Bottom Layer" at 3620.45,7970 h60
  text "Pad" at 5120,7970 h60
  text "Rectangle" at 5709.85,7970 h60
  text "(Mixed)" at 6455.65,7970 h60
  text "A" at 96.3,7960.01 h66.67
  text "2" at 631.27,7820 h60
  text "74.80mil (1.900mm)" at 1231.11,7820 h60
  text "PTH" at 2380.77,7820 h60
  text "Round" at 2886.65,7820 h60
  text "Top Layer - Bottom Layer" at 3620.45,7820 h60
  text "Pad" at 5120,7820 h60
  text "Rounded" at 5709.85,7820 h60
  text "(Mixed)" at 6455.65,7820 h60
  text "2" at 631.27,7670 h60
  text "127.95mil (3.250mm)" at 1231.11,7670 h60
  text "NPTH" at 2380.77,7670 h60
  text "Round" at 2886.65,7670 h60
  text "Top Layer - Bottom Layer" at 3620.45,7670 h60
  text "Pad" at 5120,7670 h60
  text "Rounded" at 5709.85,7670 h60
  text "c0hn325o0_0m10mx10p0" at 6455.65,7670 h60
  text "4" at 631.27,7520 h60
  text "23.62mil (0.600mm)" at 1231.11,7520 h60
  text "PTH" at 2380.77,7520 h60
  text "Slot" at 2886.65,7520 h60
  text "Top Layer - Bottom Layer" at 3620.45,7520 h60
  text "Pad" at 5120,7520 h60
  text "Rounded" at 5709.85,7520 h60
  text "r135_110h60_85r55" at 6455.65,7520 h60
  text "4" at 631.27,7370 h60
  text "37.40mil (0.950mm)" at 1231.11,7370 h60
  text "PTH" at 2380.77,7370 h60
  text "Round" at 2886.65,7370 h60
  text "Top Layer - Bottom Layer" at 3620.45,7370 h60
  text "Pad" at 5120,7370 h60
  text "(Mixed)" at 5709.85,7370 h60
  text "(Mixed)" at 6455.65,7370 h60
  text "4" at 631.27,7220 h60
  text "59.06mil (1.500mm)" at 1231.11,7220 h60
  text "PTH" at 2380.77,7220 h60
  text "Slot" at 2886.65,7220 h60
  text "Top Layer - Bottom Layer" at 3620.45,7220 h60
  text "Pad" at 5120,7220 h60
  text "(Mixed)" at 5709.85,7220 h60
  text "(Mixed)" at 6455.65,7220 h60
  text "D" at 96.3,7210.01 h66.67
  text "4" at 631.27,7070 h60
  text "122.05mil (3.100mm)" at 1231.11,7070 h60
  text "PTH" at 2380.77,7070 h60
  text "Round" at 2886.65,7070 h60
  text "Top Layer - Bottom Layer" at 3620.45,7070 h60
  text "Pad" at 5120,7070 h60
  text "Rounded" at 5709.85,7070 h60
  text "c550h310" at 6455.65,7070 h60
  text "6" at 631.27,6920 h60
  text "47.24mil (1.200mm)" at 1231.11,6920 h60
  text "PTH" at 2380.77,6920 h60
  text "Round" at 2886.65,6920 h60
  text "Top Layer - Bottom Layer" at 3620.45,6920 h60
  text "Pad" at 5120,6920 h60
  text "(Mixed)" at 5709.85,6920 h60
  text "(Mixed)" at 6455.65,6920 h60
  text "E" at 96.3,6910.01 h66.67
  text "9" at 631.27,6770 h60
  text "43.31mil (1.100mm)" at 1231.11,6770 h60
  text "PTH" at 2380.77,6770 h60
  text "Round" at 2886.65,6770 h60
  text "Top Layer - Bottom Layer" at 3620.45,6770 h60
  text "Pad" at 5120,6770 h60
  text "(Mixed)" at 5709.85,6770 h60
  text "(Mixed)" at 6455.65,6770 h60
  text "12" at 631.27,6620 h60
  text "36.00mil (0.914mm)" at 1231.11,6620 h60
  text "PTH" at 2380.77,6620 h60
  text "Round" at 2886.65,6620 h60
  text "Top Layer - Bottom Layer" at 3620.45,6620 h60
  text "Pad" at 5120,6620 h60
  text "Rounded" at 5709.85,6620 h60
  text "(Mixed)" at 6455.65,6620 h60
  text "12" at 631.27,6470 h60
  text "43.31mil (1.100mm)" at 1231.11,6470 h60
  text "PTH" at 2380.77,6470 h60
  text "Round" at 2886.65,6470 h60
  text "Top Layer - Bottom Layer" at 3620.45,6470 h60
  text "Pad" at 5120,6470 h60
  text "(Mixed)" at 5709.85,6470 h60
  text "(Mixed)" at 6455.65,6470 h60
  text "B" at 96.3,6460.01 h66.67
  text "27" at 631.27,6320 h60
  text "62.99mil (1.600mm)" at 1231.11,6320 h60
  text "PTH" at 2380.77,6320 h60
  text "Round" at 2886.65,6320 h60
  text "Top Layer - Bottom Layer" at 3620.45,6320 h60
  text "Pad" at 5120,6320 h60
  text "(Mixed)" at 5709.85,6320 h60
  text "(Mixed)" at 6455.65,6320 h60
  text "33" at 631.27,6170 h60
  text "59.06mil (1.500mm)" at 1231.11,6170 h60
  text "PTH" at 2380.77,6170 h60
  text "Round" at 2886.65,6170 h60
  text "Top Layer - Bottom Layer" at 3620.45,6170 h60
  text "Pad" at 5120,6170 h60
  text "(Mixed)" at 5709.85,6170 h60
  text "(Mixed)" at 6455.65,6170 h60
  text "635" at 631.27,6020 h60
  text "11.81mil (0.300mm)" at 1231.11,6020 h60
  text "PTH" at 2380.77,6020 h60
  text "Round" at 2886.65,6020 h60
  text "Top Layer - Bottom Layer" at 3620.45,6020 h60
  text "Via" at 5120,6020 h60
  text "Rounded" at 5709.85,6020 h60
  text "v60h30m0mx0" at 6455.65,6020 h60
  text "763 Total" at 631.27,5870 h60
  text "Slot definitions :" at 125.39,5725.03 h60
  text "Routed Path Length" at 1158.08,5725.03 h60
  text "= Calculated from tool start centre position to tool end centre position." at 2260.75,5725.03 h60
  text "Hole Length" at 1158.08,5625.05 h60
  text "= Routed Path Length + Tool Size = Slot length as defined in the PCB layout" at 1850.88,5625.05 h60

## Dimensions
6299.21,4724.41 to 6299.21,0 on Dimensions
0,4724.41 to 6299.21,4724.41 on Dimensions

## Text inside footprints (layer, text, board x,y; h text height)
D46: Top Overlay "~" at 4048.39,3995.03 h35 r180; Top Overlay "~" at 4180.44,3995.03 h35 r180; Top Overlay "-" at 4180.44,3846.54 h35 r180; Top Overlay "+" at 4048.39,3846.54 h35 r180
D47: Top Overlay "+" at 4318.39,3846.54 h35 r180; Top Overlay "-" at 4450.44,3846.54 h35 r180; Top Overlay "~" at 4450.44,3995.03 h35 r180; Top Overlay "~" at 4318.39,3995.03 h35 r180
J21: Top Overlay "1" at 3612.14,4580.56 h31.5 r180